# Altium PCB PCB_Button_Board_v2.0.PcbDoc (part 2 of 2)
Units mil, origin at the board's own origin, x right, y up, seen from the top; angles counter-clockwise.
Board outline 1338.58 x 1496.06 mil, 2 copper layers (Top Layer, Bottom Layer), stack 61.811 mil thick; 55 components, 38 nets, 175 pads, 83 vias.
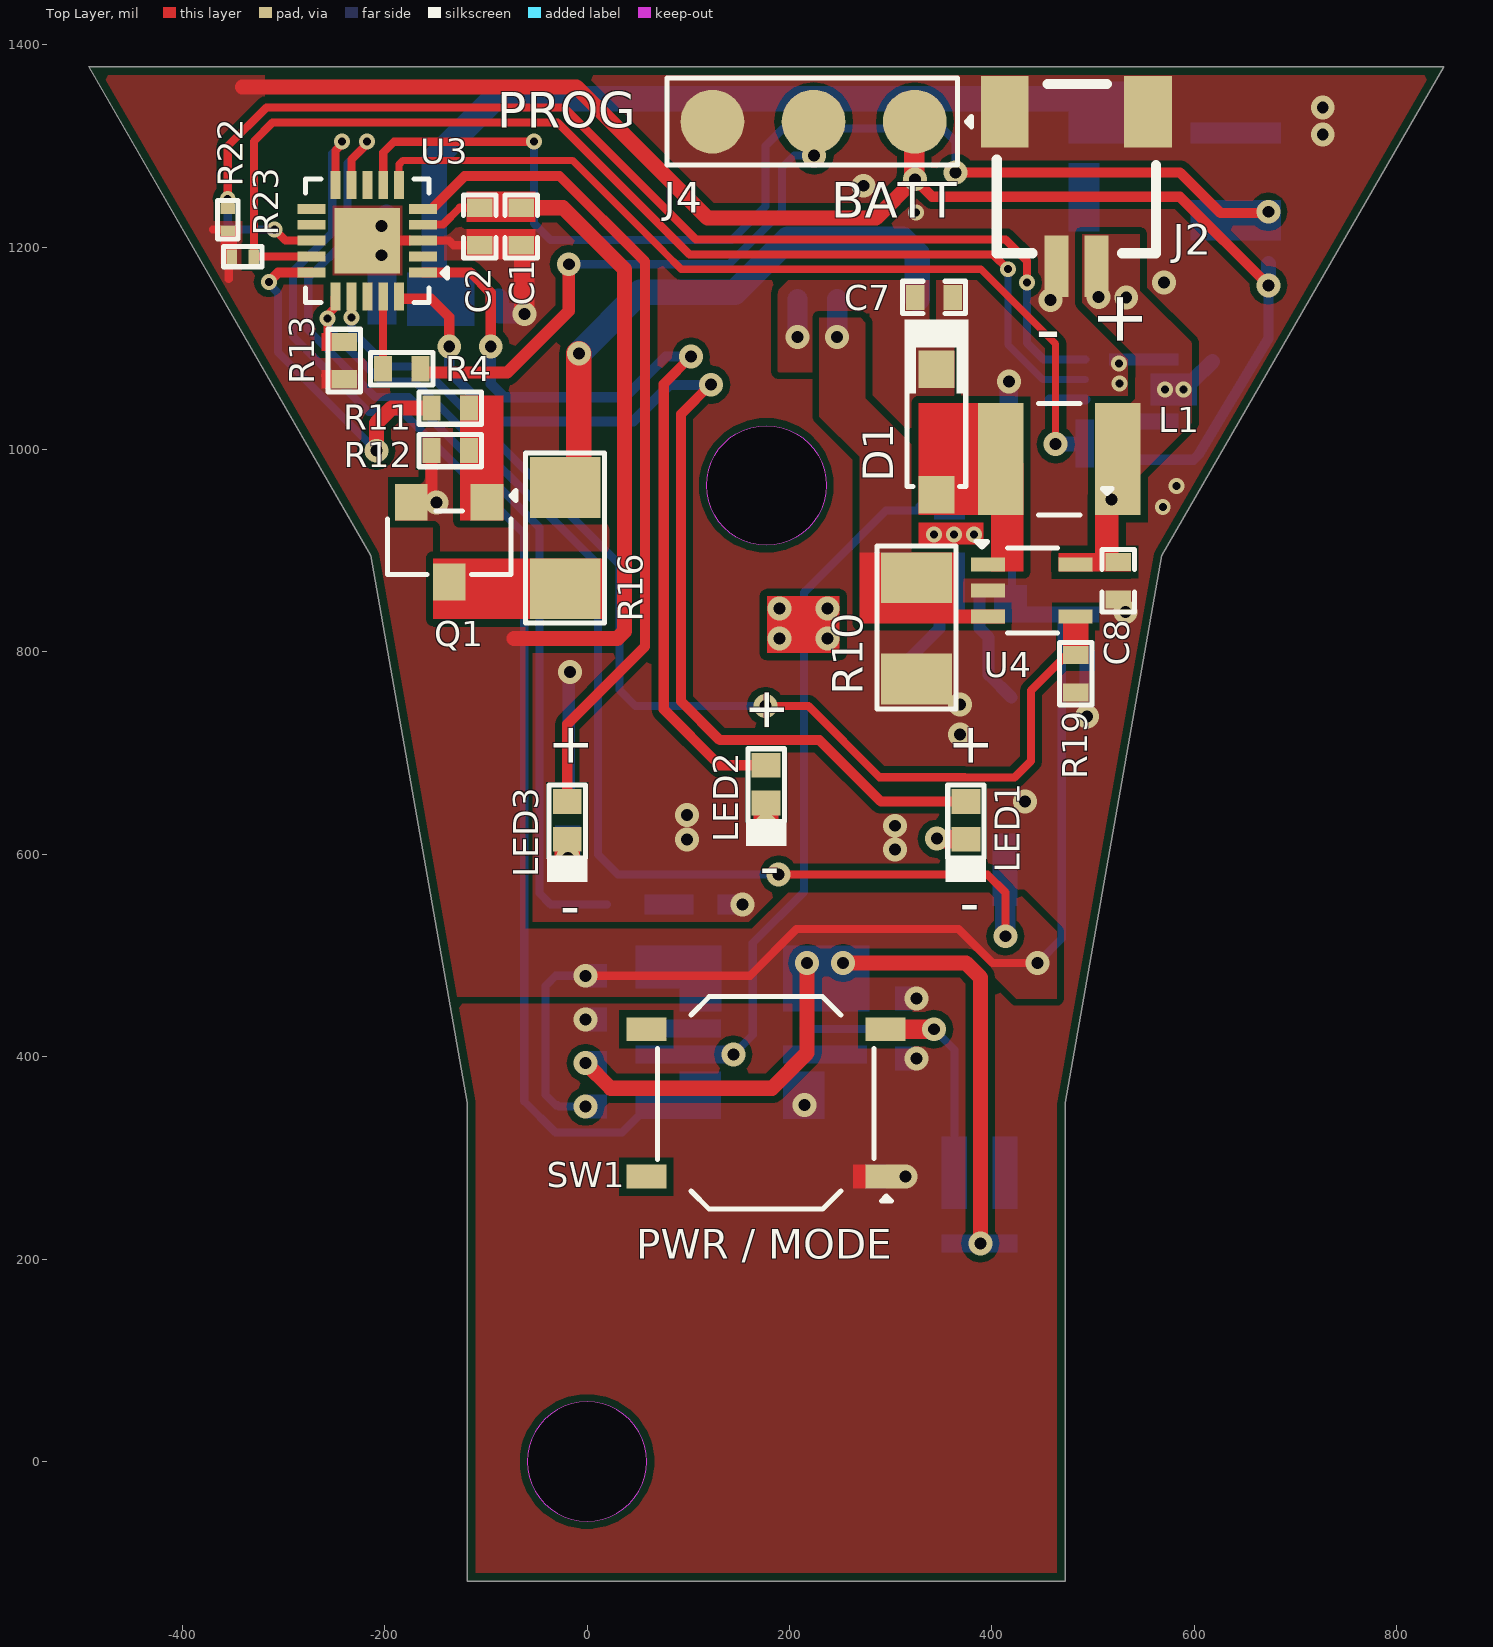
[diagram p0: Top Layer view]

## Via types
v1: diameter 23.62, hole 11.81, Top Layer to Bottom Layer, tented both sides, 58 vias
v2: diameter 15.75, hole 7.87, Top Layer to Bottom Layer, tented both sides, 20 vias
v3: diameter 23.62, hole 11.81, Top Layer to Bottom Layer, 5 vias

## Nets (pads, with @x,y where several pads share a name; then routed paths per layer and width w, separated by ;. In a path a pad name is that pad's centre, name@x,y a point inside that pad or via, vN(x,y) a via of type N, cw(c..) or ccw(c..) an arc to the next point about the centre after c; other vN are vias at no path point) (continued)
25%: (continued)
  Top Layer w10: U3.5@-152.19,1238.71 -131.11,1259.79 -131.11,1259.86 -120.76,1270.21 -27.13,1270.21 57.48,1185.6 57.48,805.49 -19.57,728.45 LED3.1
50%: LED2.1 U3.1 | length 868.9
  Top Layer w10: U3.1 -115.02,1174.79 -95.11,1154.89 v1(-95.11,1101.89) ; v3(102.78,1091.76) 75.78,1064.76 75.78,743.22 131.01,687.99 LED2.1
  Bottom Layer w10: v1(-95.11,1101.89) -95.11,1064.89 -81.81,1051.59 37.61,1051.59 77.78,1091.76 v3(102.78,1091.76)
75%: LED1.1 U3.20 | length 1051.3
  Top Layer w10: U3.20@-185.25,1148.89 -154.11,1148.89 -136.11,1130.89 v1(-136.11,1101.89) ; v3@122.61,1064.63 92.78,1034.8 92.78,751.22 131.24,712.76 229.8,712.76 290.32,652.24 LED1.1
  Bottom Layer w10: v1(-136.11,1101.89) -136.11,1077.04 -86.85,1027.78 45.78,1027.78 81.8,1063.8 v3@121.04,1063.8
  other v3: 122.61,1063.98
BATT_CHG: R1.2 U1.1 U3.7 | length 1132.8
  Top Layer w8: U3.7 -201.34,1293.55 -190.81,1304.08 v2(-52.55,1304.08)
  Top Layer w10: v1(364.09,1273.54) 586.11,1273.54 626.19,1233.46 671.87,1233.46 v1(673.3,1234.89)
  Bottom Layer w8: v2(-52.55,1304.08) -52.55,1223.25 -36.13,1206.84 143.05,1206.84 176.49,1240.28 176.49,1300 193.71,1317.23 351.17,1317.23 364.09,1304.31 v1(364.09,1273.54)
CTRL_SIG: R19.2 U3.17 U4.4 | length 1105.5
  Top Layer w8: v2(-232.84,1130.43) U3.17 ; v1@175.75,746.39 v1(176.37,746.39) 218.79,746.39 289.05,676.14 373.15,676.14 373.34,675.95 422.38,675.95 438.74,692.3 438.74,761.74 473.93,796.93 R19.2 ; 482.79,821.59 U4.4@482.79,831
  Bottom Layer w8: v2(-232.84,1130.43) -232.68,1130.27 -232.68,1117.61 -197,1081.93 -163.72,1081.93 31.93,886.28 31.93,762.18 47.72,746.39 v1(176.37,746.39)
EN_3V3: R9.1 U2.6 U6.6 | length 636.6
  Bottom Layer w8: v1(144.56,402.2) 163.81,421.45 163.81,512.31 214.29,562.8 214.29,858.52 295.51,939.73 327.23,939.73 328.74,941.25 U6.6
GND: C1.1 C2.1 C3.1 C4.1 C6.2 C7.1 C8.1 C9.2 C10.1 C12.1 C13.1 C14.1 C15.1 J2.2 J2.3 J2.4 J3.1 J3.4 J4.3 Q1.2 Q2.2 R3.1 R7.1 R8.2 R10.1 R12.2 R14.2 R15.2 R19.1 SW1.1 U1.2 U2.4 U3.3 U3.21 U4.2 U5.1 U5.4 U5.9 U6.3 U6.9 U6.11 U7.3 | length 589
  Top Layer w8: -175.75,1206.29 -136.51,1206.29 -132.01,1201.79 C2.1 ; C1.1@-67.11,1201.79 C1.1@-62.11,1196.79
  Top Layer w10: U3.21 -175.75,1206.29
  Top Layer w12: R12.2 -153.61,955.59 -148.92,950.89 v1(-148.92,947.75)
  Top Layer w15: R12.2@-153.94,998.56 R12.2 ; C2.1 C1.1@-67.11,1201.79
  Top Layer w20: C1.1@-62.11,1196.79 -62.11,1134.14 v1(-61.86,1133.89)
  Bottom Layer w8: C9.2 C9.2@494.23,798.9
  Bottom Layer w12: R15.2 -18.06,657.44 -18.06,778.94 v3(-17,780) ; R7.1 R7.1@416.73,1046.05 ; v1@416.73,1066.73 v1(417,1067)
  Bottom Layer w15: R7.1@416.47,1043.1 R7.1 ; v1@494.23,732 C9.2@494.23,798.9
  Bottom Layer w18: R7.1@416.73,1046.05 v1@416.73,1066.73
  Bottom Layer w20: J3.4 -205.11,1149 v1@-205.11,1191.89 ; v1@-203.11,1221.89 v1(-203.11,1220.89) -198.11,1225.89 -198.11,1232.09 ; J3.1 -87.11,1135.11 -86.58,1134.58 -62.55,1134.58 v1(-61.86,1133.89)
  other v1: 314.56,281.46 214.8,352.36 325.66,398.26 -1.45,436.85 325.66,457.44 153.72,550.23 304.27,604.56 98.82,614.74 304.27,628.19 98.82,638.62 432.59,652.23 368.65,718.4 494.23,736 368.65,748.03 532,839.2 457.9,1147.62 570.2,1164.82 -203.11,1191.89 273.08,1260.59 727,1311.16 727,1338
  other v2: 342.65,915.76 362.79,915.76 382.32,915.76 568.9,942.94 582.44,964.03 526,1065 525.82,1085.04 325,1234
GPOUT: R5.2 U3.6 U5.5 | length 885.9
  Top Layer w7: U3.6 -185.59,1281.78 -181.67,1285.71 -14.44,1285.71 75.98,1195.29 75.98,1195.19 93.09,1178.09 389.31,1178.09 463.08,1104.31 v1(463.08,1005.24)
  Bottom Layer w7: R5.2@491.72,994.87 491.72,1006.05
  Bottom Layer w15: v1@461.08,1005.24 v1(463.08,1005.24) 490.92,1005.24
LED_R_NEG: J1.1 R16.2 | length 568.5
  Top Layer w8: R16.2@-19.57,962.37 R16.2@-8.11,973.83
  Top Layer w25: R16.2@-8.11,973.83 v1(-8.11,1094.89)
  Bottom Layer w25: v1(-8.11,1094.89) 52.39,1155.4 146.05,1155.4 198.24,1207.59 311.81,1207.59 326.26,1193.13 J1.1
LED_W_NEG: J1.3 R10.2 U4.3 | length 37.9
  Bottom Layer w12: v3(247.11,1111.14) v3@247.31,1111.35 ; J1.3@247.31,1148.68 J1.3
  Bottom Layer w20: v3@247.31,1111.35 J1.3@247.31,1148.68
LED_W_POS: C7.2 D1.2 J1.4 | length 38
  Bottom Layer w12: v3(207.87,1111) v3@208.01,1111.14 ; J1.4@208.01,1148.75 J1.4
  Bottom Layer w20: v3@208.01,1111.14 J1.4@208.01,1148.75
M_BUTTON: C15.2 R13.1 U3.16 U7.4 | length 1210.2
  Top Layer w8: v2@-258.09,1129.28 -258.09,1131.3 -249.51,1139.89 -249.51,1150.25 U3.16 ; -256.92,1106.28 -256.53,1106.67 v2(-256.53,1129.28) ; v1(189.39,580) 395.52,580 413.36,562.17 v1(413.36,519)
  Bottom Layer w8: v2(-256.53,1129.28) -255.05,1127.8 -255.05,1118.77 -203.21,1066.93 -169.93,1066.93 10.72,886.28 10.72,599.89 30.61,580 v1(189.39,580)
  Bottom Layer w20: U7.4@413.04,559.03 413.18,558.89 413.18,519.18 v1(413.36,519)
NetC13_2: C13.2 U2.3
NetC14_2: C14.2 U2.7
NetD1_1: D1.1 L1.2 U4.1
NetL2_1: L2.1 U6.4 | length 111.9
  Bottom Layer w12: L2.1@314.83,754.83 314.83,789.65 348.42,823.25 U6.4
NetL2_2: L2.2 U6.2 | length 111.1
  Bottom Layer w12: U6.2 387.79,823.26 396.87,814.18 396.87,777.35 L2.2@419.39,754.83
NetLED1_2: LED1.2 R8.1
  other v1: 345.6,615.4
NetLED2_2: LED2.2 R14.1
  other v1: 176.88,628.1
NetLED3_2: LED3.2 R15.1
  other v1: -18.93,596.15
NetQ1_1: Q1.1 R11.2 R12.1
NetQ1_3: Q1.3 R16.1
NetQ2_1: Q2.1 R21.1
NetQ2_3: Q2.3 R20.2 U2.8
NetR3_2: R3.2 U1.5
NetR4_1: R4.1 U3.19 | length 64.2
  Top Layer w8: R4.1@-201.42,1086.89 U3.19@-201.42,1151.09
NetR6_2: R6.2 U7.1
NetR7_2: R7.2 U5.6 | length 40.7
  Bottom Layer w7: R7.2 R7.2@457.09,1049.4
  Bottom Layer w10: R7.2@457.09,1049.4 U5.6
P_BUTTON: R18.2 SW1.4 U2.2 U7.2 | length 251.4
  Bottom Layer w8: U2.2 214.52,427.46 342.44,427.46 v1(342.78,427.13) 363,406.91 U7.2
RED_LED: R11.1 U3.15 | length 344.8
  Top Layer w10: v2(-314.41,1165.56) -305.17,1174.79 U3.15
  Top Layer w15: v1(-208.12,998.76) -208.12,1025.99 -193.22,1040.89 R11.1
  Bottom Layer w8: v2(-314.41,1165.56) -314.41,1163.71 -305.41,1154.7 -305.41,1096.04 v1(-208.12,998.76)
SCL: R23.2 U3.14 U5.7 | length 1139.4
  Top Layer w8: R23.2@-329.24,1195.59 -329.24,1304.38 -310.66,1322.95 -29.04,1322.95 101.33,1192.59 401.3,1192.59 v2(415.8,1178.09) ; R23.2@-324.44,1190.79 U3.14@-272.21,1190.79
  Bottom Layer w7: v2(415.8,1178.09) 415.8,1103.67 450.38,1069.09 U5.7
SDA: R22.2 U3.13 U5.8 | length 1180.2
  Top Layer w8: v2(-355,1247.63) -355,1299.83 -316.88,1337.95 -22.83,1337.95 107.54,1207.59 413.48,1207.59 434.8,1186.26 v2(434.8,1164.82) ; v2(-308.93,1217.4) -297.82,1206.29 U3.13
  Bottom Layer w8: v2(-355,1247.63) -355,1223.89 -348.51,1217.4 v2(-308.93,1217.4) ; v2(434.8,1164.82) 434.8,1105.17 451.2,1088.77 U5.8
U_INT: R17.2 U2.5 U3.10 | length 1271.8
  Top Layer w8: U3.10 -248.59,1295.5 -242.1,1301.98 v2(-242.1,1304.08)
  Bottom Layer w8: v2(-242.1,1304.08) -242.1,1301.98 -251.7,1292.38 -251.7,1214.37 -290.41,1175.67 -290.41,1111.7 -215.64,1036.93 -182.36,1036.93 -62,916.57 -62,356 -31,325 34.46,325 56.72,347.26 R17.2
U_KILL: R21.2 U3.9 | length 1001
  Top Layer w8: U3.9 -232.84,1286.65 -217.5,1301.98 v2(-217.5,1304.08)
  Bottom Layer w8: v2(-217.5,1304.08) -217.5,1301.98 -236.7,1282.79 -236.7,1208.04 -275.41,1169.33 -275.41,1117.91 -209.43,1051.93 -176.15,1051.93 -47,922.79 -47,561.49 -35.91,550.39 R21.2
UPDI: J4.2 R4.2 | length 569
  Top Layer w12: R4.2 -164.61,1079.08 -161.61,1076.08 -78.76,1076.08 -18,1136.84 v1(-18,1183)
  Top Layer w20: v1(224.45,1290.65) J4.2@224.45,1327.32
  Bottom Layer w8: v1(-18,1183) 140.42,1183 192.47,1235.05 192.47,1278.32 204.81,1290.65 v1(224.45,1290.65)
VBATT: C4.2 C6.1 C8.2 C10.2 C12.2 J1.2 J2.1 L1.1 R6.1 R9.2 R18.1 U1.3 U2.1 U4.5 U5.2 U5.3 U6.5 U6.7 U6.8 | length 791.2
  Top Layer w15: v1(-1.45,393.75) 23.48,368.82 182.83,368.82 217.52,403.5 v1(217.52,492.56) ; v1(253,492.61) 374.43,492.61 388.68,478.36 v1(388.68,215.54)
  Bottom Layer w10: 230.63,481.46 235.01,477.09
  Bottom Layer w15: C10.2@617.93,1087.02 598.4,1067.49 595.2,1067.49 v2@590.21,1062.5 ; v2@590.21,1062.5 590.21,1059.3 v2@590.21,1062.5
  Bottom Layer w20: v1@235.73,810.39 237.6,812.27 v1(237.6,813.25)
  other v1: 190.01,813.25 190.01,842.88 237.6,842.88 518.44,950.76 505.27,1150.62 532.82,1150.23
  other v2: 570.9,1059.43 589.21,1059.3
VCC_3V3: C1.2 C2.2 C9.1 J4.1 R1.1 R5.1 R13.2 R17.1 R20.1 R22.1 R23.1 U3.4 U6.1 U6.10 | length 3385
  Top Layer w7: -343.15,1355.56 -340.41,1358.29
  Top Layer w8: -369.39,1217.15 -356.02,1217.15 R22.1 ; -353.97,1168.29 -353.97,1187.55 R23.1 ; -258.68,1073 -243.63,1073 R13.2 ; U3.4 -161.86,1222.15 -142.41,1222.15 -125.77,1238.79 C2.2 C2.2@-104.97,1238.79 ; v1(-1.45,479.94) 160.94,479.94 207.18,526.18 367.03,526.18 400.59,492.61 v1(445,492.61) v1@447,492.61
  Top Layer w10: C2.2@-102.97,1238.79 C1.2 ; -73,814 -72.25,813.25 ; v1(323.89,1267) 341.16,1249.73 585.7,1249.73 v1(673.3,1162.13)
  Top Layer w15: -340.41,1358.29 -10.37,1358.29 119.17,1228.76 285.65,1228.76 v1(323.89,1267) ; -72.25,813.25 29.86,813.25 36.98,820.36 36.98,1178.01 -23.8,1238.79 C1.2
  Top Layer w20: v1@323.44,1267.44 J4.1@323.44,1328.44
  Bottom Layer w8: v1(-1.45,350.7) -27.7,350.7 -29,352 -30.61,352 -41,362.39 -41,470 -31.06,479.94 v1(-1.45,479.94) ; U6.1@407.48,860.38 U6.1 417.75,852.8 420.11,855.16 420.11,923.73 407.48,936.36 U6.10 ; v1(445,492.61) 469.11,516.73 469.11,840.69
  Bottom Layer w10: R5.1 595.56,989.87 599.28,989.87 604.13,994.72 673.3,1109.91 v1(673.3,1162.13)
  Bottom Layer w15: v1@673.3,1163.17 R1.1
VUSB: C3.2 J3.2 J3.3 U1.4 | length 871
  Bottom Layer w20: -139.11,1159.89 -132.11,1159.89 -127.11,1164.89 J3.2@-124.11,1164.89
  Bottom Layer w25: -144.61,1148.39 -150.88,1154.66 -150.88,1159.89 -150.88,1287.57 -91.99,1346.46 499.7,1346.46 U1.4@526,1320.16
pads on no net: J1.S1 J1.S2 J3.S1 J3.S2 SW1.2 SW1.3 U3.2 U3.8 U3.11 U3.12 U3.18

## Polygon pours and split planes (outlines as drawn)
VBATT on Bottom Layer "VBATT_L02_P005" (solid, pour order 5): 267.07,1086.12 267.07,1174.48 306.17,1174.48 306.17,1123.3 346.41,1123.3 346.41,1220.66 546.15,1220.66 546.15,1136.76 410.15,1136.76 402.33,1128.95 402.33,1073.63 532,976.13 532,895.38 432.34,895.38 396.87,930.85 342.91,930.85 342.91,964.97 306.17,964.97 205.14,863.55 205.14,798.81 171.35,798.81 171.35,1022.41 235.06,1086.12
GND on Bottom Layer "GND_L02_P010" (solid, remove dead copper, pour order 10): -492.11,1377.89 845.89,1377.89 837.89,1363.89 817.89,1328.89 799.89,1296.89 763.89,1234.89 738.89,1191.89 701.89,1126.89 610.89,968.89 567.89,895.89 545.89,773.89 492.89,472.89 472.89,354.89 472.89,-118.11 -118.11,-118.11 -118.11,354.89 -120.11,369.89 -136.11,457.89 -158.11,581.89 -197.11,802.89 -213.11,894.89 -237.11,936.89 -264.11,983.89
VBATT on Bottom Layer "VBATT_L02_P001" (solid, pour order 1): 279.35,789.65 279.35,492.61 193.51,492.61 193.51,542.02 222.22,570.73 222.22,866.45 333.69,866.45 334.25,865.89 334.25,789.65
GND on Top Layer "GND_L01_P011" (solid, remove dead copper, pour order 11): 541.81,750.69 567.84,895.38 646.11,1042.44 741.24,1195.89 799.89,1296.89 817.89,1328.89 845.89,1377.89 -492.11,1377.89 -264.11,983.89 -237.11,936.89 -213.11,894.89 -197.11,802.89 -158.11,581.89 -136.11,457.89 -120.11,369.89 -118.11,354.89 -118.11,-118.11 472.89,-118.11 472.89,354.89 492.89,472.89
VBATT on Top Layer "VBATT_L01_P012" (solid, pour order 12): 510.22,1038.73 530.57,1038.73 541.8,1049.97 542.07,1092.17 489.44,1144.8 489.44,1212.64 546.15,1212.64 546.15,1156.91 597.34,1105.72 597.34,1025.85 524.57,953.08 510.22,953.08
VCC_3V3 on Top Layer "VCC_3V3_L01_P007" (solid, pour order 7): -483.27,1370.53 -318.45,1370.53 -318.45,1229.9 -166.11,1077.56 -166.11,998.98 -152.35,985.21 -152.35,824.09 -61,824.09 -61,526.18 162.77,526.18 198.77,562.17 425.94,562.17 464.28,523.83 464.28,457.44 424,457.44 374.44,507 209.95,507 209.95,459.29 -129.78,459.29 -158.11,621.59 -216.87,914.42 -262.18,987.44 -483.27,1355.56
LED_W_POS on Top Layer "Top Layer-LED_W_POS" (solid, pour order 16): 188.69,1076.52 188.69,1157.01 200.46,1168.79 338.07,1168.79 338.07,1125.34 362.97,1100.43 362.97,1009.22 279.46,1009.22 279.46,1134.67 225.71,1134.67 225.71,1076.52
LED_W_NEG on Top Layer "Top Layer-LED_W_NEG" (solid, pour order 14): 229.5,1130.01 275.08,1130.01 275.08,1050.39 320.4,1005.07 320.4,855 269.39,855 269.39,992.59 229.5,1032.48

## Other copper
Top Layer:
  rectangle net VBATT: 502.13,879.7 525,955.31
  rectangle net GND: 327.54,906 392,928
  rectangle net VBATT: 466.06,879.29 537.5,897.7
  rectangle net CTRL_SIG: 470.29,787.93 495.29,835
  rectangle net LED_W_NEG: 269.39,828.11 412.91,841.89
  rectangle net LED_W_NEG: 269.39,828.11 364.66,898.2
  rectangle net NetD1_1: 399,879.29 431.3,986.47
  rectangle net NetD1_1: 327.54,935.16 421.8,1045.79
  rectangle net VBATT: 177.79,798.81 249.64,855
  rectangle net VCC_3V3: -262.18,1060.28 -227.42,1078.28
  rectangle net M_BUTTON: -262.18,1097.28 -227.42,1115.28
  rectangle net VCC_3V3: -362.28,1183.26 -345.66,1221.45
  rectangle net NetQ1_3: -152.35,832.37 15.43,892.37
  rectangle net NetQ1_1: -125.61,929.64 -82.66,1053.39
  region net NetLED3_2: -7.07,623.83 -32.07,623.83 -32.07,591.98 -7.07,591.98
  region net NetLED2_2: 189.45,659.59 164.45,659.59 164.45,627.74 189.45,627.74
  region net NetLED1_2: 386.93,605.83 386.93,624.06 351.57,624.06 351.57,605.83
  region net P_BUTTON: 342.78,436.57 294.88,436.57 294.88,417.5 342.78,417.5
  rectangle net GND: 262.97,269.65 294.88,293.27
  rectangle net VCC_3V3: -119.11,1224.89 -51.11,1254.89
  rectangle net GND: -119.11,1187.89 -51.11,1217.89
Bottom Layer:
  rectangle net VBATT: 556.88,1043.5 602.7,1074.99
  rectangle net GND: 475.51,1215.13 506.23,1283.16
  rectangle net GND: 515.94,1019.91 584.44,1035.57
  rectangle net GND: 515.94,1082.87 584.44,1094.68
  rectangle net GPOUT: 482.72,982.37 500.72,1029.72
  rectangle net VBATT: 274.53,839.71 334.25,861.38
  rectangle net VCC_3V3: 401.97,829.09 434.7,865.89
  region net NetLED1_2: 346.03,624.39 346.03,606.17 381.39,606.17 381.39,624.39
  rectangle net NetLED2_2: 164.39,628.54 189.39,660.39
  rectangle net NetLED3_2: -31.61,596.54 -6.61,628.39
  rectangle net GND: 128.81,540.35 153.72,560.43
  rectangle net NetQ2_1: 56.72,540.35 105.19,560.43
  rectangle net VBATT: 342.91,930.85 373.62,957.03
  rectangle net VCC_3V3: 401.97,829.09 505.87,844.75
  rectangle net GND: 362.6,839.71 373.62,898.37
  rectangle net VBATT: 350.5,206.5 425.5,224.5
  rectangle net GND: 193.51,338.26 234.85,385.47
  region net VCC_3V3: 19.72,362.51 -1.45,362.51 -1.45,338.88 19.72,338.88
  region net VCC_3V3: 19.72,491.76 -1.45,491.76 -1.45,468.13 19.72,468.13
  region net VBATT: 19.72,405.56 -1.45,405.56 -1.45,381.93 19.72,381.93
  region net GND: 19.72,448.66 -1.45,448.66 -1.45,425.03 19.72,425.03
  rectangle net GND: 304.5,386.45 325.66,410.08
  rectangle net GND: 304.5,445.63 325.66,469.26
  rectangle net GND: 304.5,457.39 325.66,457.44
  rectangle net BATT_CHG: 596.29,1206.43 685.8,1246.39
  rectangle net VUSB: 475.51,1302.16 544.96,1363.59
  rectangle net NetR3_2: 596.14,1302.16 685.8,1323.02
  rectangle net NetR6_2: 400.5,249.5 425.5,321
  region net M_BUTTON: 425.5,620.39 400.5,620.39 400.5,548.89 425.5,548.89
  rectangle net P_BUTTON: 350.5,249.5 375.5,321
  rectangle net NetC13_2: 193.51,393.35 276.5,411.06
  rectangle net VBATT: 193.51,444.53 279.35,509.65
  rectangle net U_INT: 91.15,338.26 132.49,385.47
  rectangle net U_INT: 47.72,338.26 132.49,367.76
  rectangle net NetQ2_3: 47.72,467.5 133,509.65
  rectangle net NetQ2_3: 91.15,444.53 133,509.65
  rectangle net EN_3V3: 47.72,393.35 144.56,411.06
  rectangle net NetC14_2: 47.72,418.94 132.49,436.65
  rectangle net VUSB: -178.11,1121.89 -111.11,1174.89
  rectangle net GND: -217.03,1123.3 -188.11,1236.89

## Silkscreen, mask and mechanical layers (free items; w line width, h text height)
Top Overlay:
  lines w5: 518.29,961.19 509.16,961.19 513.97,956.38 518.78,961.19 ; 384.57,909.13 395.79,909.13 390.18,903.52 384.57,909.13
  text "PROG" at -88.65,1305.82 h60
  text "BATT" at 241.2,1217.06 h60
  text "+" at 548.62,1100.08 h50 r90
  text "-" at 467.97,1094.48 h50
  text "+" at 195.05,719.39 h40 r90
  text "+" at 1,684.65 h40 r90
  text "+" at 396.44,684.73 h40 r90
  text "-" at 190.28,568.53 h40
  text "-" at 388.13,532.16 h40
  text "-" at -6.57,529.16 h40
  text "PWR / MODE" at 48.59,190.62 h50
Bottom Overlay:
  text "LED" at 333.96,1046.66 h60
  text "USB" at -88.38,1045.27 h60
Dimensions:
  drawing of 13727 lines, arcs and shapes, not listed
  text "Layer" at -985.66,2711 h60
  text "Name" at -575.74,2711 h60
  text "Material" at 354,2711 h60
  text "Thickness" at 1213.77,2711 h60
  text "Constant" at 1863.6,2711 h60
  text "Board Layer Stack" at 2433.46,2711 h60
  text "Top Overlay" at -575.74,2591 h60
  text "Top Solder" at -575.74,2471 h60
  text "Solder Resist" at 354,2471 h60
  text "0.010mm" at 1213.77,2471 h60
  text "3.5" at 1863.6,2471 h60
  text "1" at -985.66,2351 h60
  text "Top Layer" at -575.74,2351 h60
  text "Copper" at 354,2351 h60
  text "0.035mm" at 1213.77,2351 h60
  text "Dielectric 1" at -575.74,2231 h60
  text "FR-4" at 354,2231 h60
  text "1.500mm" at 1213.77,2231 h60
  text "4.8" at 1863.6,2231 h60
  text "2" at -985.66,2111 h60
  text "Bottom Layer" at -575.74,2111 h60
  text "Copper" at 354,2111 h60
  text "0.035mm" at 1213.77,2111 h60
  text "Bottom Solder" at -575.74,1991 h60
  text "Solder Resist" at 354,1991 h60
  text "0.010mm" at 1213.77,1991 h60
  text "3.5" at 1863.6,1991 h60
  text "Bottom Overlay" at -575.74,1871 h60
  text "Total board thickness:" at -985.66,1751 h60
  text "1.590mm" at 1213.77,1751 h60
Board Shape:
  circle w5: c0,0 r59.06
  circle w5: c177.17,964.57 r59.06
  lines w10: -492.13,1377.95 -213.51,895.38 -118.11,354.33 -118.11,0 -118.11,-118.11 0,-118.11 472.44,-118.11 472.44,354.33 567.84,895.38 846.46,1377.95 -492.13,1377.95

## Dimensions
846.46,1377.95 to 480.89,-121.11 on Dimensions
-492.13,1377.95 to 846.46,1377.95 on Dimensions
472.44,-118.11 to -118.11,-118.11 on Dimensions